# Altium PCB Quickswitch_BRD.PcbDoc (part 2 of 2)
Units mm, origin at the board's own origin, x right, y up, seen from the top; angles counter-clockwise.
Board outline 35 x 35 mm, 2 copper layers (Top Layer, Bottom Layer), stack 1.57 mm thick; 44 components, 30 nets, 158 pads, 68 vias.
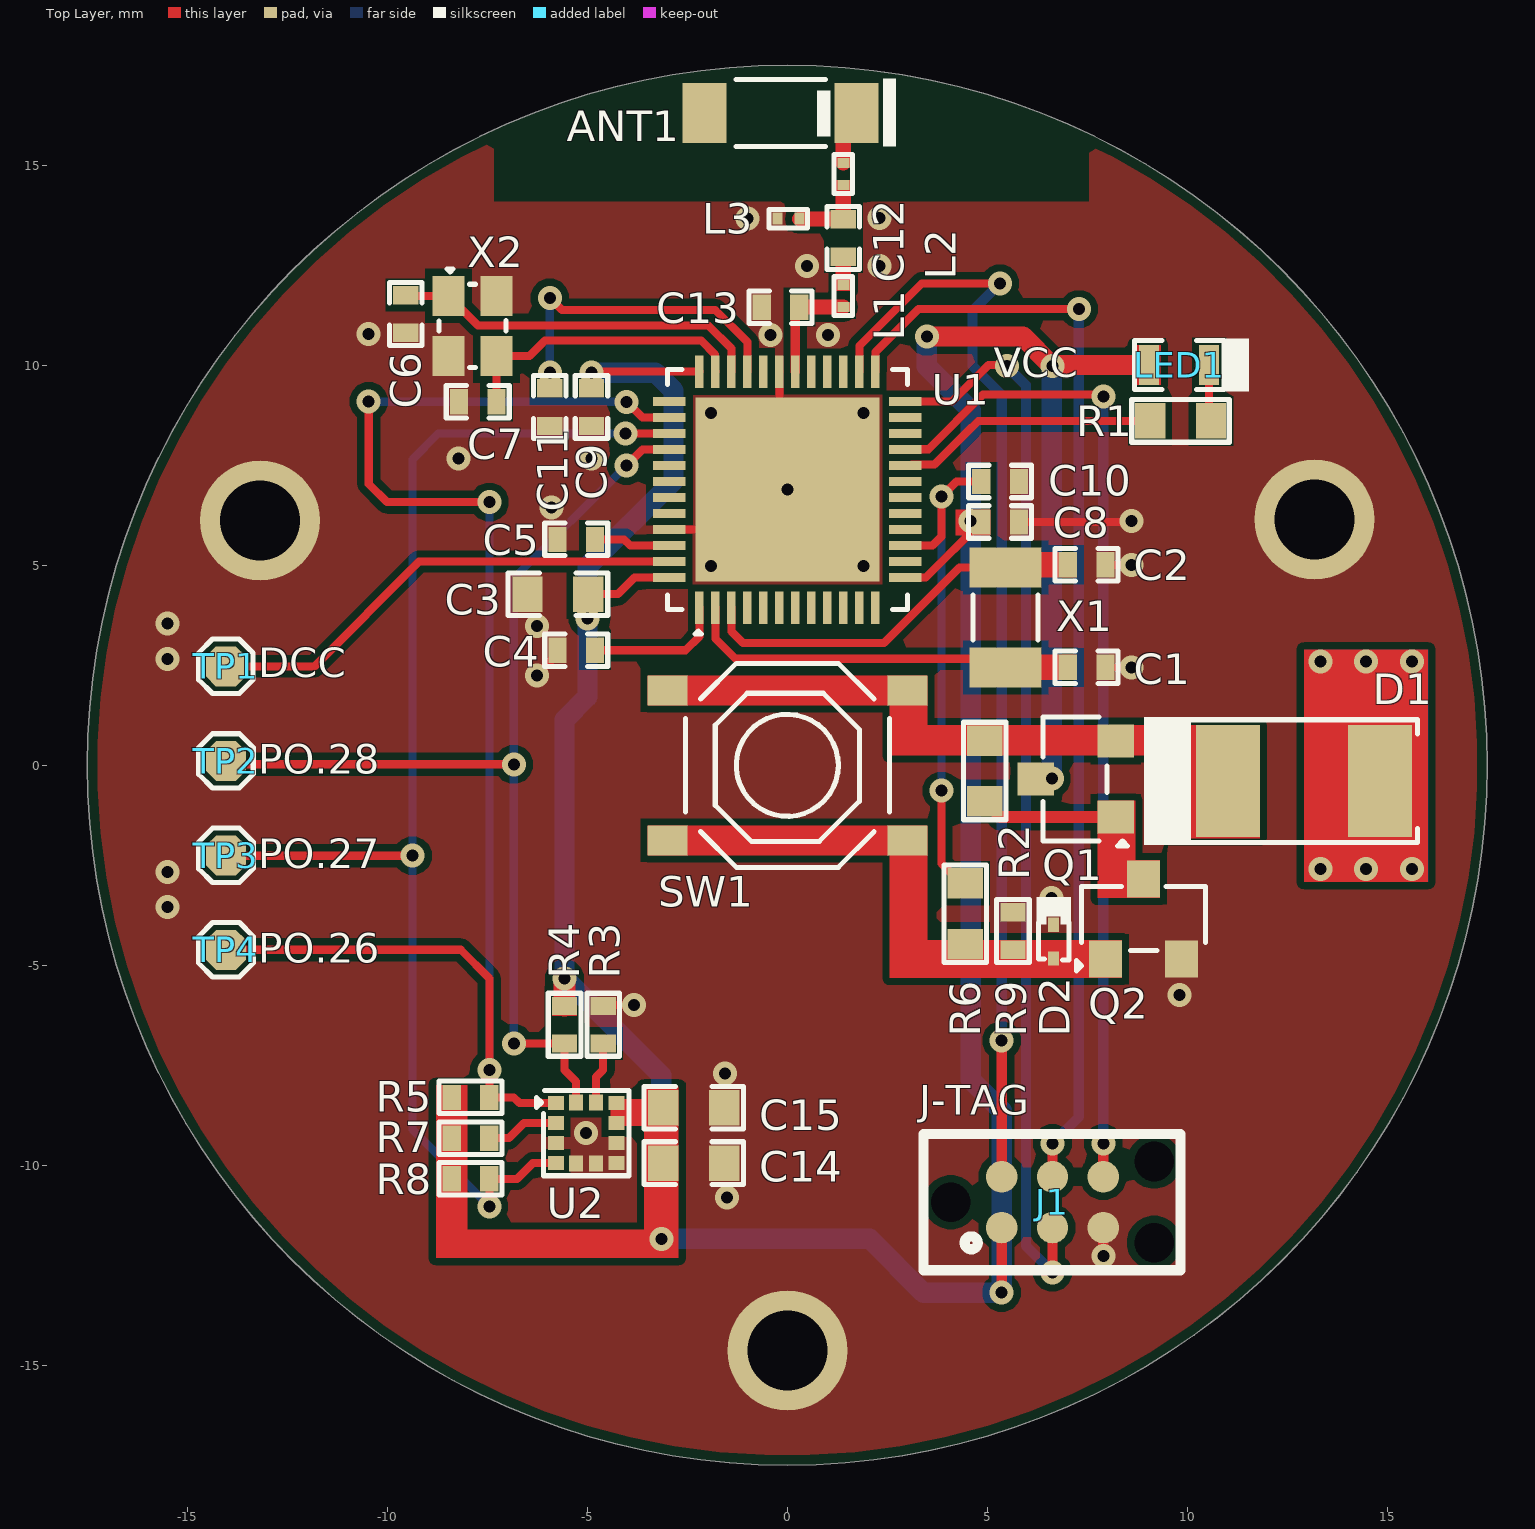
[diagram p0: Top Layer view]

## Via types
v1: diameter 0.6, hole 0.3, Top Layer to Bottom Layer, tented both sides, 68 vias

## Nets (pads, with @x,y where several pads share a name; then routed paths per layer and width w, separated by ;. In a path a pad name is that pad's centre, name@x,y a point inside that pad or via, vN(x,y) a via of type N, cw(c..) or ccw(c..) an arc to the next point about the centre after c; other vN are vias at no path point) (continued)
P0.28: (continued)
  Top Layer w0.203: TP2.1 -13.949,0.025 v1(-6.838,0.025) ; v1(-6.838,-6.955) R4.2 -5.569,-7.613 -5.279,-7.904 U2.12 ; v1(-4.023,7.493) -3.623,7.893 U1.40
  Bottom Layer w0.203: v1(-6.838,-6.955) -6.838,-6.848 -6.838,-3.117 -6.838,-0.158 -6.783,-0.102 v1@-6.71,-0.102 ; v1(-6.838,0.025) -6.838,1.318 -6.838,4.678 v1(-4.023,7.493)
SWCLK: J1.4 U1.25 | length 28
  Top Layer w0.203: U1.25 2.208,9.851 2.208,10.329 3.284,11.405 v1(7.29,11.405)
  Top Layer w0.254: J1.4 v1(6.629,-9.449)
  Bottom Layer w0.254: v1(6.629,-9.449) 7.285,-8.793 7.285,11.4 v1(7.29,11.405)
SWDIO: J1.2 U1.26 | length 27.7
  Top Layer w0.203: U1.26 1.8,10.489 3.361,12.05 v1(5.317,12.05)
  Top Layer w0.254: J1.2 v1(5.359,-6.883)
  Bottom Layer w0.254: v1(5.317,12.05) 4.629,11.362 4.629,9.989 5.359,9.259 v1(5.359,-6.883)
SWO: J1.6 U1.21 | length 24.8
  Top Layer w0.203: U1.21 2.958,7.901 3.526,7.901 4.895,9.271 7.645,9.271 v1@7.696,9.22
  Top Layer w0.254: J1.6 v1(7.899,-9.449)
  Bottom Layer w0.254: v1(7.899,-9.449) v1(7.899,9.22)
VCC: C3.2 C8.2 C9.2 C14.2 C15.1 J1.1 LED1.1 Q1.3 R4.1 R5.1 R7.2 R8.1 U1.13 U1.36 U1.48 U2.9 U2.10 | length 86.2
  Top Layer w0.203: R4.1@-5.59,-6.015 R4.1@-5.569,-5.994 ; C3.2 -4.229,4.28 -3.816,4.693 U1.48 ; C9.2 v1@-4.895,9.742 ; v1(-4.895,9.818) v1@-4.895,9.742 ; U1.36 -4.794,9.843 v1@-4.895,9.742 ; U1.13 3.461,4.693 C8.2
  Top Layer w0.254: v1(5.359,-13.183) J1.1@5.359,-11.557
  Top Layer w0.508: v1(-4.997,3.671) -4.997,4.254 C3.2 ; v1(3.488,10.719) 5.893,10.719 6.604,10.008 6.629,10.008 LED1.1
  Top Layer w0.559: R4.1@-5.569,-5.994 v1(-5.569,-5.326)
  Bottom Layer w0.508: v1(-4.895,9.818) -3.295,9.818 -2.844,9.367 -2.844,7.113 -4.997,4.96 v1(-4.997,3.671) -4.997,1.708 -5.569,1.136 -5.569,-5.289 -5.588,-5.308 v1(-5.569,-5.326) -3.15,-7.746 v1(-3.15,-11.836) 2.058,-11.836 3.404,-13.183 v1(5.359,-13.183) 5.359,-8.636 4.585,-7.861 v1(4.585,6.109) 4.585,8.877 3.488,9.974 v1(3.488,10.719) ; v1(6.613,-0.326) v1@6.613,9.965
  other v1: 6.629,9.982
XC1: C6.2 U1.34 X2.1 | length 9.3
  Top Layer w0.203: C6.2 -9.528,11.736 X2.1 -7.733,10.998 -1.976,10.998 -1.4,10.423 U1.34
XC2: C7.2 U1.35 X2.3 | length 7.3
  Top Layer w0.203: C7.2 -7.271,9.094 X2.3 -6.441,10.236 -6.06,10.617 -2.151,10.617 -1.808,10.275 -1.808,9.851 U1.35
XL1: C1.2 U1.2 X1.1 | length 8.4
  Top Layer w0.203: U1.2 -1.8,3.165 -1.298,2.664 X1.1@5.142,2.664 ; X1.1@5.142,2.765 X1.1
XL2: C2.2 U1.3 X1.2 | length 8.4
  Top Layer w0.203: U1.3 -1.4,3.348 -1.11,3.058 2.419,3.058 4.308,4.948 X1.2
pads on no net: ANT1.2 J1.MP1 J1.MP2 J1.MP3 U1.4 U1.5 U1.6 U1.7 U1.8 U1.9 U1.10 U1.11 U1.12 U1.14 U1.16 U1.17 U1.18 U1.19 U1.22 U1.23 U1.27 U1.28 U1.29 U1.32 U1.37 U1.41 U1.42 U1.43 U1.44

## Polygon pours and split planes (outlines as drawn)
GND on Bottom Layer "NONET_L-01_P-001" (solid, pour order 0): 0,-17.5 cw(c0,0) -17.5,0 cw(c0,0) 0,17.5 cw(c0,0) 17.5,0 cw(c0,0)
GND on Top Layer "NONET_L-01_P-001" (solid, pour order 1): 0,-17.5 cw(c0,0) -17.5,0 cw(c0,0) 0,17.5 cw(c0,0) 17.5,0 cw(c0,0)

## Other copper
Top Layer:
  region net NetC12_2: 1.59,14.631 1.21,14.631 1.21,14.193 1.59,14.193
  rectangle net NetC12_1: 1.21,11.861 1.59,12.299
  region net NetQ1_1: 9.316,-3.319 9.316,-2.361 7.749,-2.361 7.749,-3.319
  rectangle net VCC: 4.206,5.745 5.08,6.401
  rectangle net VCC: -5.887,-6.269 -5.252,-5.787
  region net BATT+: 16.017,2.896 12.919,2.896 12.919,-2.921 16.017,-2.921
  rectangle net VCC: -8.783,-12.319 -2.718,-11.608
  rectangle net VCC: 8.677,9.508 9.346,10.508
  rectangle net VCC: -8.783,-12.319 -7.996,-7.986
  rectangle net VCC: -4.418,-9.02 -2.718,-8.345
  rectangle net VCC: -3.581,-12.319 -2.718,-8.026
  rectangle net NetQ1_1: 7.749,-3.319 8.707,-0.885
  region net NetD2_2: 8.366,-5.319 8.366,-4.369 2.55,-4.369 2.55,-5.319
  rectangle net NetD2_2: 2.55,-5.319 3.5,-1.5
  rectangle net NetD2_2: -3.5,-2.25 3.5,-1.5
  rectangle net BATT#: 9.477,-1.832 11.811,1.006
  rectangle net BATT#: 2.55,0.245 11.811,1.006
  rectangle net BATT#: 2.55,0.245 3.5,2.25
  rectangle net BATT#: -3.5,1.5 3.5,2.25
  rectangle net XL1: 5.359,2.13 7.243,2.765
  rectangle net XL2: 5.359,4.696 7.243,5.331
  pour cut-out: -7.341,14.089 -7.341,17.499 7.543,17.499 7.543,14.089
Bottom Layer:
  rectangle net BATT+: 12.929,-2.921 16.027,2.896
  pour cut-out: -7.341,14.089 -7.341,17.499 7.543,17.499 7.543,14.089

## Silkscreen, mask and mechanical layers (free items; w line width, h text height)
Top Overlay:
  text "VCC" at 5.161,9.447 h1.27
  text "DCC" at -13.23,1.947 h1.27
  text "PO.28" at -13.23,-0.466 h1.27
  text "PO.27" at -13.23,-2.827 h1.27
  text "PO.26" at -13.23,-5.189 h1.27
  text "J-TAG" at 3.294,-8.981 h1.27
Dimension:
  lines w0.127: 0,-17.5 0,0 0,17.5 0,17.5
Board Outline:
  circle w0.254: c0,0 r17.5
Mechanical 3:
  drawing of 191 lines, arcs and shapes, not listed
  text "Layer" at 23.611,17.755 h1.52
  text "Name" at 34.023,17.755 h1.52
  text "Material" at 57.639,17.755 h1.52
  text "Thickness" at 79.477,17.755 h1.52
  text "Constant" at 95.982,17.755 h1.52
  text "Board Layer Stack" at 110.457,17.755 h1.52
  text "Top Overlay" at 34.023,14.707 h1.52
  text "Top Solder" at 34.023,11.659 h1.52
  text "Solder Resist" at 57.639,11.659 h1.52
  text "0.39mil" at 79.477,11.659 h1.52
  text "3.5" at 95.982,11.659 h1.52
  text "1" at 23.611,8.611 h1.52
  text "Top Layer" at 34.023,8.611 h1.52
  text "1.38mil" at 79.477,8.611 h1.52
  text "Dielectric 1" at 34.023,5.563 h1.52
  text "FR-4" at 57.639,5.563 h1.52
  text "59.06mil" at 79.477,5.563 h1.52
  text "4.8" at 95.982,5.563 h1.52
  text "2" at 23.611,2.515 h1.52
  text "Bottom Layer" at 34.023,2.515 h1.52
  text "1.38mil" at 79.477,2.515 h1.52
  text "Bottom Solder" at 34.023,-0.533 h1.52
  text "Solder Resist" at 57.639,-0.533 h1.52
  text "0.39mil" at 79.477,-0.533 h1.52
  text "3.5" at 95.982,-0.533 h1.52
  text "Bottom Overlay" at 34.023,-3.581 h1.52
  text "Total board thickness:" at 23.611,-6.629 h1.52
  text "62.60mil" at 79.477,-6.629 h1.52
Drill Drawing:
  circle w0.254: c24.197,29.434 r0.847
  lines w0.254: 23.35,34.091 25.043,34.091 24.197,32.398 23.35,34.091 ; 23.35,36.208 25.043,36.208 25.043,37.901 23.35,37.901 23.35,36.208
  lines w0.381: 21.831,27.445 347.064,27.445 ; 21.831,38.875 347.064,38.875 ; 35.824,23.635 35.824,42.685 ; 49.536,23.635 49.536,42.685 ; 77.468,23.635 77.468,42.685 ; 90.317,23.635 90.317,42.685 ; 108.956,23.635 108.956,42.685 ; 147.044,23.635 147.044,42.685 ; 162.026,23.635 162.026,42.685 ; 180.97,23.635 180.97,42.685 ; 200.014,23.635 200.014,42.685 ; 221.7,23.635 221.7,42.685 ; 255.574,23.635 255.574,42.685 ; 289.447,23.635 289.447,42.685 ; 311.438,23.635 311.438,42.685 ; 21.831,23.635 347.064,23.635 347.064,42.685 21.831,42.685 21.831,23.635
  text "Symbol" at 24.117,40.018 h1.83
  text "Count" at 36.967,40.018 h1.83
  text "Hole Size" at 50.679,40.018 h1.83
  text "Plated" at 78.611,40.018 h1.83
  text "Hole Type" at 91.46,40.018 h1.83
  text "Drill Layer Pair" at 110.099,40.018 h1.83
  text "Via/Pad" at 148.187,40.018 h1.83
  text "Pad Shape" at 163.169,40.018 h1.83
  text "Template" at 182.113,40.018 h1.83
  text "Description" at 201.157,40.018 h1.83
  text "Hole Tolerance (+)" at 222.843,40.018 h1.83
  text "Hole Tolerance (-)" at 256.717,40.018 h1.83
  text "Hole Length" at 290.59,40.018 h1.83
  text "Routed Path Length" at 312.581,40.018 h1.83
  text "3" at 36.967,36.208 h1.52
  text "39.02mil (0.991mm)" at 50.679,36.208 h1.52
  text "PTH" at 78.611,36.208 h1.52
  text "Round" at 91.46,36.208 h1.52
  text "Top Layer - Bottom Layer" at 110.099,36.208 h1.52
  text "Pad" at 148.187,36.208 h1.52
  text "Rounded" at 163.169,36.208 h1.52
  text "c0h99" at 182.113,36.208 h1.52
  text "-" at 290.59,36.208 h1.52
  text "-" at 312.581,36.208 h1.52
  text "3" at 36.967,32.398 h1.52
  text "78.74mil (2.000mm)" at 50.679,32.398 h1.52
  text "PTH" at 78.611,32.398 h1.52
  text "Round" at 91.46,32.398 h1.52
  text "Top Layer - Bottom Layer" at 110.099,32.398 h1.52
  text "Pad" at 148.187,32.398 h1.52
  text "Rounded" at 163.169,32.398 h1.52
  text "c300h200" at 182.113,32.398 h1.52
  text "-" at 290.59,32.398 h1.52
  text "-" at 312.581,32.398 h1.52
  text "68" at 36.967,28.588 h1.52
  text "11.81mil (0.300mm)" at 50.679,28.588 h1.52
  text "PTH" at 78.611,28.588 h1.52
  text "Round" at 91.46,28.588 h1.52
  text "Top Layer - Bottom Layer" at 110.099,28.588 h1.52
  text "Via" at 148.187,28.588 h1.52
  text "Rounded" at 163.169,28.588 h1.52
  text "v60h30m0mx0" at 182.113,28.588 h1.52
  text "-" at 290.59,28.588 h1.52
  text "-" at 312.581,28.588 h1.52
  text "74 Total" at 36.967,24.778 h1.52

## Dimensions
-17.5,0 to 17.5,0 on Dimension